# Altium PCB MSP430F5438A_Core_Board.PcbDoc
Units mil, origin at the board's own origin, x right, y up, seen from the top; angles counter-clockwise.
Board outline 2608.13 x 2230 mil, 2 copper layers (Top Layer, Bottom Layer); 34 components, 98 nets, 281 pads, 107 vias.
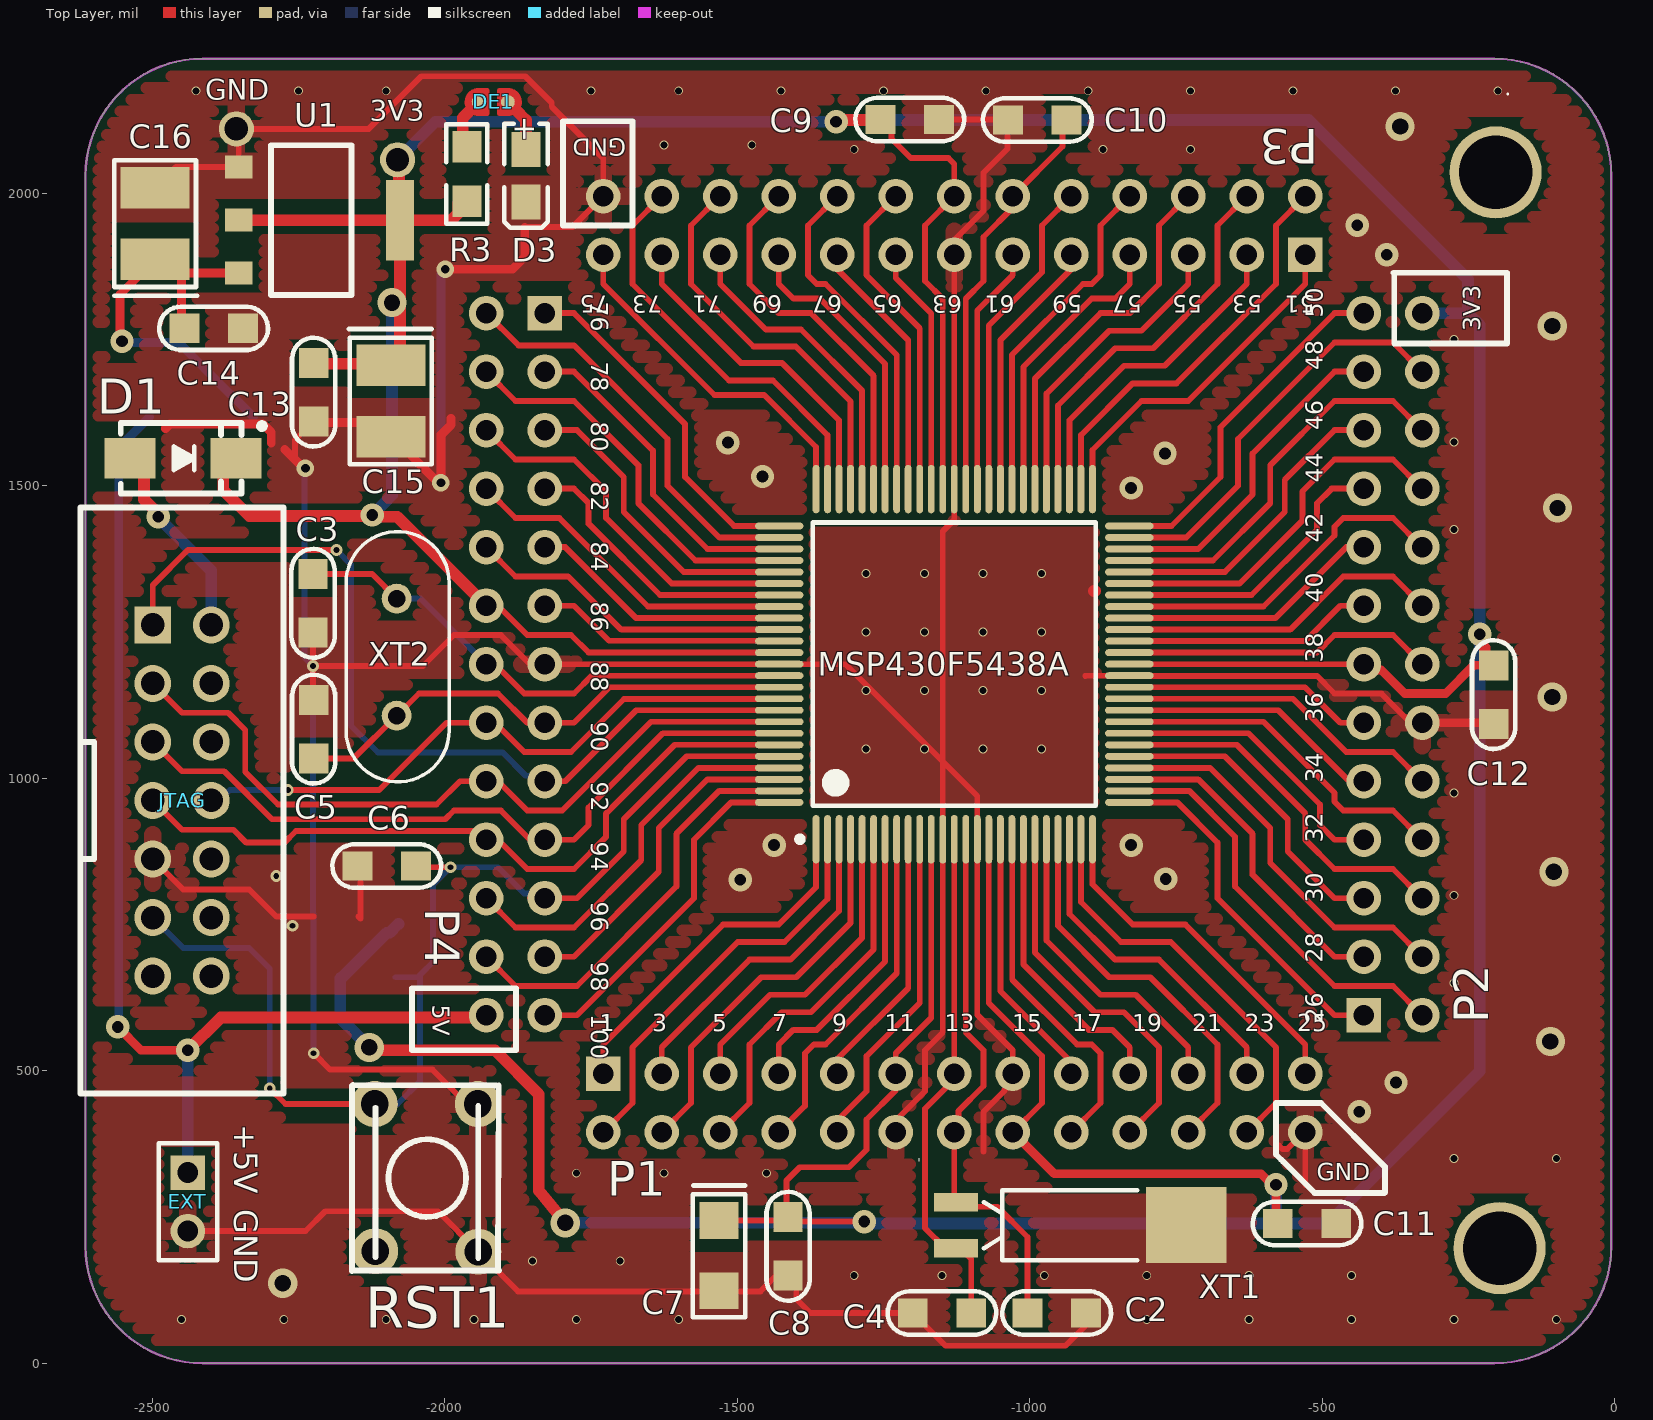
[diagram p0: Top Layer view]
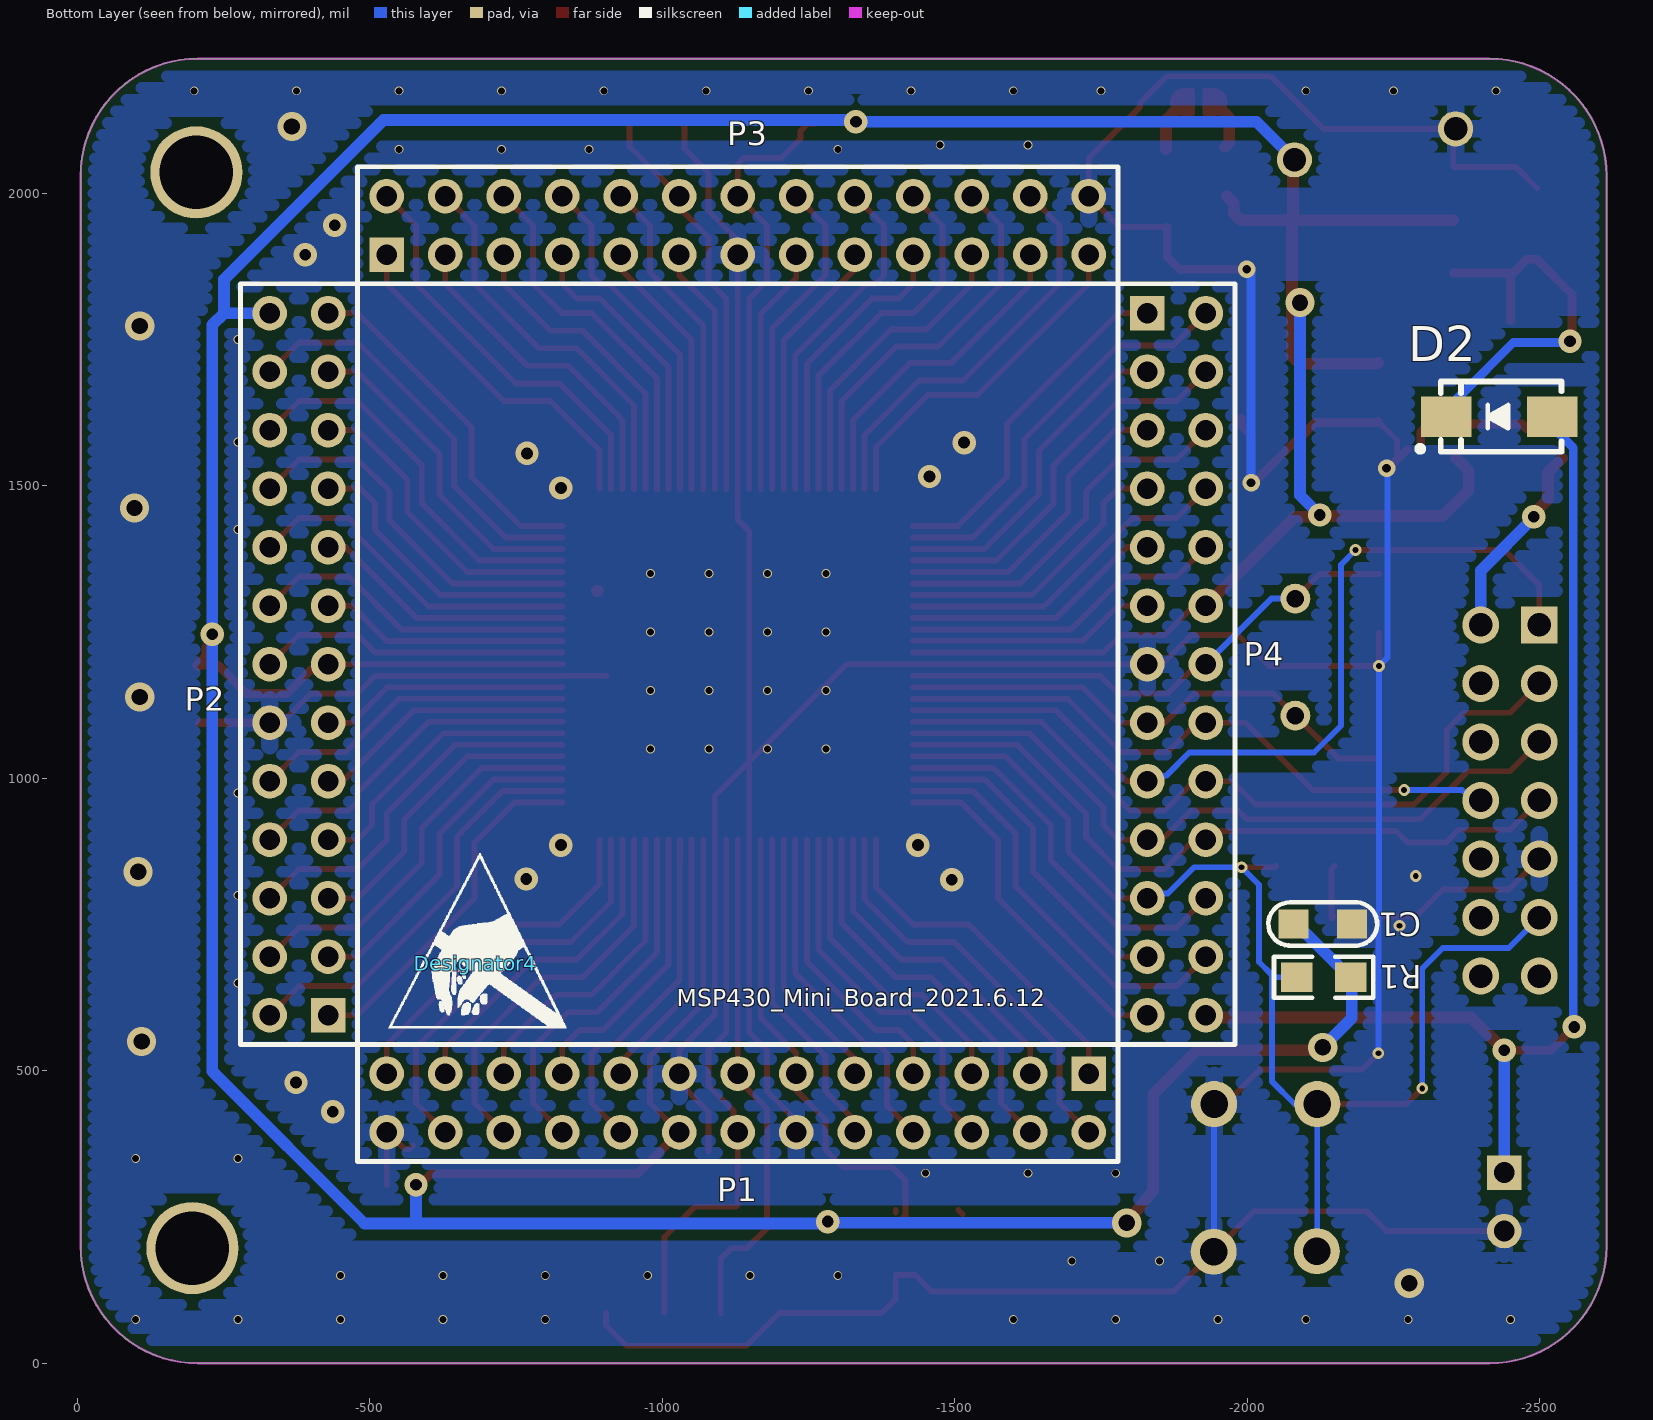
[diagram p1: Bottom Layer view, seen from below]

## Layer stack, top to bottom
Top Solder: solder mask 0.4, Solder Resist, Dk 3.5
Top Layer: signal copper 1.4
Dielectric1: dielectric 12.6, FR-4, Dk 4.8
Bottom Layer: signal copper 1.4
Bottom Solder: solder mask 0.4, Solder Resist, Dk 3.5

## Board outline
-2614,200 -2614,2030 cw(c-2414,2030) -2414,2230 -205.87,2230 cw(c-205.87,2030) -5.87,2030 -5.87,200 cw(c-205.87,200) -205.87,0 -2414,0 cw(c-2414,200)

## Design rules (kind name [scope] priority, off if disabled: settings)
Clearance poly [InPolygon] p1: gap=20 ignorepadtopadclearanceinfootprint=FALSE except(0: Arc-Hole Track-Hole SMDPad-Hole THPad-Hole Via-Hole Fill-Hole Poly-Region Poly-Text Poly-Hole Region-Hole Text-Hole; 10: Arc-Poly Track-Poly SMDPad-Poly THPad-Poly Via-Poly Fill-Poly Poly-Poly)
Clearance MSP430F5438 [InComponent('MSP430F5438')] p2: gap=6 ignorepadtopadclearanceinfootprint=FALSE except(0: Arc-Hole Track-Hole SMDPad-Hole THPad-Hole Via-Hole Fill-Hole Poly-Hole Region-Hole Text-Hole)
Clearance signal [All] p3: gap=8 ignorepadtopadclearanceinfootprint=FALSE except(0: Arc-Hole Track-Hole SMDPad-Hole THPad-Hole Via-Hole Fill-Hole Poly-Hole Region-Hole Text-Hole; 6: SMDPad-SMDPad)
DiffPairsRouting [All] p1: maxlimit=10 minlimit=10 mostfreqgap=10 substack1={DAF84A33-5D85-44D9-B187-5EEDEE5C1D0D} toplayer_{daf84a33-5d85-44d9-b187-5eedee5c1d0d}_minwidth=15 toplayer_{daf84a33-5d85-44d9-b187-5eedee5c1d0d}_maxwidth=15 toplayer_{daf84a33-5d85-44d9-b187-5eedee5c1d0d}_prefwidth=15 bottomlayer_{daf84a33-5d85-44d9-b187-5eedee5c1d0d}_minwidth=15 bottomlayer_{daf84a33-5d85-44d9-b187-5eedee5c1d0d}_maxwidth=15 bottomlayer_{daf84a33-5d85-44d9-b187-5eedee5c1d0d}_prefwidth=15 substack2={A4BFDC1A-52A9-4A62-862A-EA300D616A80} toplayer_{a4bfdc1a-52a9-4a62-862a-ea300d616a80}_minwidth=15 toplayer_{a4bfdc1a-52a9-4a62-862a-ea300d616a80}_maxwidth=15 toplayer_{a4bfdc1a-52a9-4a62-862a-ea300d616a80}_prefwidth=15 bottomlayer_{a4bfdc1a-52a9-4a62-862a-ea300d616a80}_minwidth=15 bottomlayer_{a4bfdc1a-52a9-4a62-862a-ea300d616a80}_maxwidth=15 bottomlayer_{a4bfdc1a-52a9-4a62-862a-ea300d616a80}_prefwidth=15 substack3={3F915A36-B763-4A6B-97BD-B3E40C8C71F4} toplayer_{3f915a36-b763-4a6b-97bd-b3e40c8c71f4}_minwidth=15 toplayer_{3f915a36-b763-4a6b-97bd-b3e40c8c71f4}_maxwidth=15 toplayer_{3f915a36-b763-4a6b-97bd-b3e40c8c71f4}_prefwidth=15 bottomlayer_{3f915a36-b763-4a6b-97bd-b3e40c8c71f4}_minwidth=15 bottomlayer_{3f915a36-b763-4a6b-97bd-b3e40c8c71f4}_maxwidth=15 bottomlayer_{3f915a36-b763-4a6b-97bd-b3e40c8c71f4}_prefwidth=15 substack4={48F7E08D-F82E-4384-AB96-C3FD184F4D58} toplayer_{48f7e08d-f82e-4384-ab96-c3fd184f4d58}_minwidth=15 toplayer_{48f7e08d-f82e-4384-ab96-c3fd184f4d58}_maxwidth=15 toplayer_{48f7e08d-f82e-4384-ab96-c3fd184f4d58}_prefwidth=15 bottomlayer_{48f7e08d-f82e-4384-ab96-c3fd184f4d58}_minwidth=15 bottomlayer_{48f7e08d-f82e-4384-ab96-c3fd184f4d58}_maxwidth=15 bottomlayer_{48f7e08d-f82e-4384-ab96-c3fd184f4d58}_prefwidth=15 substack5={598D3BEE-A53D-4EBE-981A-87FF3B1BF0A2} toplayer_{598d3bee-a53d-4ebe-981a-87ff3b1bf0a2}_minwidth=15 toplayer_{598d3bee-a53d-4ebe-981a-87ff3b1bf0a2}_maxwidth=15 toplayer_{598d3bee-a53d-4ebe-981a-87ff3b1bf0a2}_prefwidth=15 bottomlayer_{598d3bee-a53d-4ebe-981a-87ff3b1bf0a2}_minwidth=15 bottomlayer_{598d3bee-a53d-4ebe-981a-87ff3b1bf0a2}_maxwidth=15 bottomlayer_{598d3bee-a53d-4ebe-981a-87ff3b1bf0a2}_prefwidth=15 toplayer_minwidth=15 toplayer_maxwidth=15 toplayer_prefwidth=15 bottomlayer_minwidth=15 bottomlayer_maxwidth=15 bottomlayer_prefwidth=15 substack6={9BED3A91-6FF6-4AC0-9484-6C846679E73A} toplayer_{9bed3a91-6ff6-4ac0-9484-6c846679e73a}_minwidth=15 toplayer_{9bed3a91-6ff6-4ac0-9484-6c846679e73a}_maxwidth=15 toplayer_{9bed3a91-6ff6-4ac0-9484-6c846679e73a}_prefwidth=15 bottomlayer_{9bed3a91-6ff6-4ac0-9484-6c846679e73a}_minwidth=15 bottomlayer_{9bed3a91-6ff6-4ac0-9484-6c846679e73a}_maxwidth=15 bottomlayer_{9bed3a91-6ff6-4ac0-9484-6c846679e73a}_prefwidth=15 substack7={07ACAAC9-AFB2-42D8-B364-51B12A73FC90} toplayer_{07acaac9-afb2-42d8-b364-51b12a73fc90}_minwidth=15 toplayer_{07acaac9-afb2-42d8-b364-51b12a73fc90}_maxwidth=15 toplayer_{07acaac9-afb2-42d8-b364-51b12a73fc90}_prefwidth=15 bottomlayer_{07acaac9-afb2-42d8-b364-51b12a73fc90}_minwidth=15 bottomlayer_{07acaac9-afb2-42d8-b364-51b12a73fc90}_maxwidth=15 bottomlayer_{07acaac9-afb2-42d8-b364-51b12a73fc90}_prefwidth=15 maxuncoupledlength=500
HoleSize [All] p1: absolutevalues=TRUE maxlimit=1000 minlimit=1 maxpercent=80.000 minpercent=20.000
PolygonConnect [All] p1: thpad.connectstyle=Relief thpad.reliefconductorwidth=30 thpad.reliefentries=4 thpad.polygonreliefangle="90 Angle" thpad.airgapwidth=10 smdpad.connectstyle=Direct smdpad.reliefconductorwidth=10 smdpad.reliefentries=4 smdpad.polygonreliefangle="90 Angle" smdpad.airgapwidth=10 via.connectstyle=Direct via.reliefconductorwidth=10 via.reliefentries=4 via.polygonreliefangle="90 Angle" via.airgapwidth=10
RoutingVias [All] p1: holewidth=15 width=30 viastyle="Through Hole" minholewidth=10 minwidth=20 maxholewidth=28 maxwidth=50
SilkToSolderMaskClearance SilkscreenOverComponentPads [IsPad] p1: minsilkscreentomaskgap=0 clearancetoexposedcopper=TRUE
SolderMaskExpansion [All] p1: expansion=4 istentingtop=FALSE
Width [All] p1: maxlimit=30 minlimit=6 preferedwidth=10 substack1={DAF84A33-5D85-44D9-B187-5EEDEE5C1D0D} substack2={A4BFDC1A-52A9-4A62-862A-EA300D616A80} substack3={3F915A36-B763-4A6B-97BD-B3E40C8C71F4} substack4={48F7E08D-F82E-4384-AB96-C3FD184F4D58} substack5={598D3BEE-A53D-4EBE-981A-87FF3B1BF0A2} substack6={9BED3A91-6FF6-4AC0-9484-6C846679E73A} substack7={07ACAAC9-AFB2-42D8-B364-51B12A73FC90}
27 further rules are at their usual default settings.

## Components (designator, comment, footprint, x,y, rotation, side; value= is the part's Value field where it differs from the comment)
C1 "Cap" C0805 -2129,751 r180 bottom value=0.1uF
C2 "Cap" c0805 -954,86 r180 top value=22pF
C3 "Cap" c0805 -2225,1299 r90 top value=22pF
C4 "Cap" C0805 -1150,86 r0 top value=22pF
C5 "Cap" c0805 -2224,1084 r270 top value=22pF
C6 "Cap" c0805 -2099,850 r180 top value=10nF
C7 "Cap Pol1" 3216 -1531,184 r270 top value=4.7uF
C8 "Cap" C0805 -1413,200 r270 top value=0.1uF
C9 "Cap" C0805 -1205,2126 r0 top value=0.1uF
C10 "Cap" c0805 -987,2125 r180 top value=0.47uF
C11 "Cap" C0805 -526.03,239 r180 top value=0.1uF
C12 "Cap" C0805 -207,1143 r270 top value=0.1uF
C13 "Cap" C0805 -2224,1660 r270 top value=0.1uF
C14 "Cap" C0805 -2395,1769 r0 top value=0.1uF
C15 "Cap Pol1" 3528 -2092,1645 r270 top value=10uF/16V
C16 "Cap Pol1" 3528 -2495,1948 r90 top value=10uF/16V
D1 "SS24" SMA -2447.41,1547 r0 top
D2 "SS24" SMA -2430.55,1618 r0 bottom
D3 "RED" Diode0805 -1861,2030 r270 top
DE1 "DEBUG PAD" DEBUG_B -1917,2156 r0 top
Designator4 "Comment" ICO1 -680,684 r180 bottom
EXT "Header 2H" HDR1X2 -2439,326 r270 top
JTAG "Header 7X2" DC-2.54-L-Z-14P -2449,962 r270 top locked
MSP430F5438A "MSP430F5438IPZ" PZ100_M -1129,1195 r90 top
P1 "Header 13X2H" HDR2X13 -1729,495 r0 bottom
P2 "Header 13X2H" HDR2X13 -429,595 r90 bottom
P3 "Header 13X2H" HDR2X13 -529,1895 r180 bottom
P4 "Header 13X2H" HDR2X13 -1829,1795 r270 bottom
R1 "Res2" 0805 -2130.57,660 r180 bottom value=47K
R3 "Res2" 0805 -1962,2033 r270 top value=330R
RST1 "SW-PB" BUTTON -2031,317 r270 top
U1 "1117M3" SOT-223 -2352,1954 r270 top
XT1 "32K" OSC-3x8-WS -1125.96,236 r270 top
XT2 "25MHz" JZ-2 -2082,1207 r90 top

## Footprints (in the part's own frame and the unit in brackets; to place one, negate y for a bottom-side part, rotate by r counter-clockwise, add the part's x,y. Pads: shape width x height; smd on the part's side, far side on the other; paste and mask are expansions set on the pad)
0805 [mil] "Chip Resistor, Body 2.0x1.2mm, IPC Medium Density"
  rect 54x50 smd: 1(-46.24,0) 2(46.43,0)
  silkscreen extent -85,-35 85,35, body extent -42,-28 42,28, height 28
3216 [mm]
  rect 1.6x1.7 smd: A(-1.524,0) K(1.524,0)
  silkscreen extent -3.05,-1.14 2.67,1.14
3528 [mm]
  rect 1.8x3 smd: A(-1.55,0) K(1.55,0)
  silkscreen extent -3.12,-1.83 2.75,1.78
BUTTON [mm]
  round 2 hole 1.2: 1(-3.205,2.23) 1(3.205,2.25) 2(-3.205,-2.25) 2(3.185,-2.23)
  silkscreen extent -4.03,-3.23 4.05,3.15
C0805 [mm] "Chip Capacitor, Body 2.0x1.3mm, IPC High Density"
  rect 1.3x1.27 smd: 1(-1.27,0) 2(1.27,0)
  silkscreen extent -2.36,-0.94 2.36,0.94, body extent -1.07,-0.7 1.07,0.7, height 0.7
c0805 [mm] "Chip Capacitor, Body 2.0x1.3mm, IPC High Density"
  rect 1.3x1.27 smd: 1(-1.27,0) 2(1.27,0)
  silkscreen extent -2.36,-0.94 2.36,0.94, body extent -1.07,-0.7 1.07,0.7, height 0.7
DC-2.54-L-Z-14P [mm] "立式直插简牛插座，间距2.54"
  rect 1.6x1.6 hole 1.02: 1(-7.62,-1.27)
  round 1.6 hole 1.02: 2(-7.62,1.27) 3(-5.08,-1.27) 4(-5.08,1.27) 5(-2.54,-1.27) 6(-2.54,1.27) 7(0,-1.27) 8(0,1.27) 9(2.54,-1.27) 10(2.54,1.27) 11(5.08,-1.27) 12(5.08,1.27) 13(7.62,-1.27) 14(7.62,1.27)
  silkscreen extent -12.72,-4.4 12.72,4.4, body extent -12.7,-4.35 12.7,4.5, height 2.54
DEBUG_B [mm] "调试断点焊盘"
  round 0.6 smd paste-0.6: 1(-0.635,0) 2(0.635,0)
  Top Layer region: 0.254,-0.508 0.762,-0.508 0.908,-0.479 1.031,-0.396 1.114,-0.273 1.143,-0.127 1.143,-0.127 1.143,0 1.104,0.194 0.994,0.359 0.829,0.469 0.635,0.508 0.635,0.508 0.254,0.508
  Top Layer region: -0.254,0.508 -0.762,0.508 -0.908,0.479 -1.031,0.396 -1.114,0.273 -1.143,0.127 -1.143,0.127 -1.143,0 -1.104,-0.194 -0.994,-0.359 -0.829,-0.469 -0.635,-0.508 -0.635,-0.508 -0.254,-0.508
  Top Layer lines w0.203: -0.994,-0.359 ccw(c-0.635,0) -0.635,-0.508 -0.254,-0.508 -0.254,0 -0.254,0.508 -0.635,0.508 ccw(c-0.635,0) -0.994,-0.359 ; 0.254,-0.508 0.254,0 0.254,0.508 0.635,0.508 cw(c0.635,0) 0.994,-0.359 cw(c0.635,0) 0.635,-0.508 0.254,-0.508
Diode0805 [mil]
  rect 60x50 smd: 1(-45,0) 2(45,0)
  silkscreen extent -89,-37 89,37
HDR1X2 [mm] "Connector; Header; 2 Position"
  rect 1.5x1.5 hole 0.9: 1(0,0)
  round 1.5 hole 0.9: 2(2.54,0)
  silkscreen extent -1.27,-1.27 3.81,1.27
HDR2X13 [mm] "Connector; Header; 13x2 Position"
  rect 1.5x1.5 hole 0.9: 1(0,0)
  round 1.5 hole 0.9: 2(0,2.54) 3(2.54,0) 4(2.54,2.54) 5(5.08,0) 6(5.08,2.54) 7(7.62,0) 8(7.62,2.54) 9(10.16,0) 10(10.16,2.54) 11(12.7,0) 12(12.7,2.54) 13(15.24,0) 14(15.24,2.54) 15(17.78,0) 16(17.78,2.54) 17(20.32,0) 18(20.32,2.54) 19(22.86,0) 20(22.86,2.54) 21(25.4,0) 22(25.4,2.54) 23(27.94,0) 24(27.94,2.54) 25(30.48,0) 26(30.48,2.54)
  silkscreen extent -1.27,-1.27 31.75,3.81
ICO1 [mil]
  silkscreen extent -148,-111 156,187
JZ-2 [mm]
  round 1.3 hole 0.762: 1(-2.54,0) 2(2.54,0)
  silkscreen extent -5.41,-2.29 5.45,2.2
OSC-3x8-WS [mm] "脚距：2mm  淘宝ID:小糖豆的小窝窝"
  rect 3.3x3.5 smd: 0(0,10)
  rect 0.8x1.9 smd: 1(1,0) 2(-1,0)
  silkscreen extent -1.52,1.2 1.52,7.87, body extent -1.5,-0.5 1.5,10, height 3.03
PZ100_M [mm] "100-Pin Thin Quad Flat Pack 0.5 mm Pitch, IPC Low Density"
  oval 2.1x0.3 smd: 1(-7.6,6) 2(-7.6,5.5) 3(-7.6,5) 4(-7.6,4.5) 5(-7.6,4) 6(-7.6,3.5) 7(-7.6,3) 8(-7.6,2.5) 9(-7.6,2) 10(-7.6,1.5) 11(-7.6,1) 12(-7.6,0.5) 13(-7.6,0) 14(-7.6,-0.5) 15(-7.6,-1) 16(-7.6,-1.5) 17(-7.6,-2) 18(-7.6,-2.5) 19(-7.6,-3) 20(-7.6,-3.5) 21(-7.6,-4) 22(-7.6,-4.5) 23(-7.6,-5) 24(-7.6,-5.5) 25(-7.6,-6) 51(7.6,-6) 52(7.6,-5.5) 53(7.6,-5) 54(7.6,-4.5) 55(7.6,-4) 56(7.6,-3.5) 57(7.6,-3) 58(7.6,-2.5) 59(7.6,-2) 60(7.6,-1.5) 61(7.6,-1) 62(7.6,-0.5) 63(7.6,0) 64(7.6,0.5) 65(7.6,1) 66(7.6,1.5) 67(7.6,2) 68(7.6,2.5) 69(7.6,3) 70(7.6,3.5) 71(7.6,4) 72(7.6,4.5) 73(7.6,5) 74(7.6,5.5) 75(7.6,6)
  oval 0.3x2.1 smd: 26(-6,-7.6) 27(-5.5,-7.6) 28(-5,-7.6) 29(-4.5,-7.6) 30(-4,-7.6) 31(-3.5,-7.6) 32(-3,-7.6) 33(-2.5,-7.6) 34(-2,-7.6) 35(-1.5,-7.6) 36(-1,-7.6) 37(-0.5,-7.6) 38(0,-7.6) 39(0.5,-7.6) 40(1,-7.6) 41(1.5,-7.6) 42(2,-7.6) 43(2.5,-7.6) 44(3,-7.6) 45(3.5,-7.6) 46(4,-7.6) 47(4.5,-7.6) 48(5,-7.6) 49(5.5,-7.6) 50(6,-7.6) 76(6,7.6) 77(5.5,7.6) 78(5,7.6) 79(4.5,7.6) 80(4,7.6) 81(3.5,7.6) 82(3,7.6) 83(2.5,7.6) 84(2,7.6) 85(1.5,7.6) 86(1,7.6) 87(0.5,7.6) 88(0,7.6) 89(-0.5,7.6) 90(-1,7.6) 91(-1.5,7.6) 92(-2,7.6) 93(-2.5,7.6) 94(-3,7.6) 95(-3.5,7.6) 96(-4,7.6) 97(-4.5,7.6) 98(-5,7.6) 99(-5.5,7.6) 100(-6,7.6)
  silkscreen extent -7.72,-6.15 6.15,6.82, body extent -7,-7 7,7, height 1.6
SMA [mm] "4.5x2.6*2.2mm（长宽高，不包括引脚）"
  rect 2.2x1.75 smd: 1(-2.3,0) 2(2.3,0)
  silkscreen extent -2.7,-1.52 3.56,1.52, body extent -2.53,-1.3 2.58,1.3, height 2.15
SOT-223 [mm]
  rect 3.5x1.2 smd: 0(0,7)
  rect 1x1.2 smd: 1(-2.3,0) 2(0,0) 3(2.3,0)
  silkscreen extent -3.25,1.4 3.25,4.9

## Part data
C1 C2 C3 C4 C5 C6 C8 C9 C10 C11 C12 C13 C14: "Capacitor", LatestRevisionDate=17-Jul-2002, LatestRevisionNote="Re-released for DXP Platform.", PackageReference=RAD-0.3, Published=8-Jun-2000, Publisher="Altium Limited"
  C1 C2 C3 C4 C5 C6 C8 C9 C10 C11 C12: PackageDescription="Radial Cap, Thru-Hole; 2 Leads; 0.3 in Pin Spacing"
C7 C15 C16: "Polarized Capacitor (Radial)", LatestRevisionDate=17-Jul-2002, LatestRevisionNote="Re-released for DXP Platform.", PackageDescription="Polarized Capacitor (Radial); 2 Leads", PackageReference=RB7.6-15, Published=8-Jun-2000, Publisher="Altium Limited"
D1 D2: "肖特基二极管", BOM名称=肖特基二极管, 下单链接=https://item.taobao.com/item.htm?ft=t&id=613637044352, 淘宝ID=小糖豆的小窝窝
D3: library part LED0, "Typical INFRARED GaAs LED", LatestRevisionDate=08-Jul-2005, LatestRevisionNote="Mech Layer 1 removed.", PackageDescription="LED; 2 Leads", PackageReference=LED-0, Published=8-Jun-2000, Publisher="Altium Limited"
DE1: library part DEBUG, "调试断点焊盘", BOM名称=调试断点焊盘, 下单链接=https://item.taobao.com/item.htm?ft=t&id=613637044352, 淘宝ID=小糖豆的小窝窝
EXT: "Header, 2-Pin, Right Angle", LatestRevisionDate=17-Jul-2002, LatestRevisionNote="Re-released for DXP Platform.", Publisher="Altium Limited"
JTAG: "Header, 7-Pin, Dual row", LatestRevisionDate=17-Jul-2002, LatestRevisionNote="Re-released for DXP Platform.", Publisher="Altium Limited"
P1 P2 P3 P4: "Header, 13-Pin, Dual row, Right Angle", LatestRevisionDate=17-Jul-2002, LatestRevisionNote="Re-released for DXP Platform.", Publisher="Altium Limited"
R1 R3: "Resistor", LatestRevisionDate=17-Jul-2002, LatestRevisionNote="Re-released for DXP Platform.", PackageDescription="Axial Device, Thru-Hole; 2 Leads; 0.4 in Pin Spacing", PackageReference=AXIAL-0.4, Published=8-Jun-2000, Publisher="Altium Limited"
RST1: "Switch", LatestRevisionDate=17-Jul-2002, LatestRevisionNote="Re-released for DXP Platform.", PackageDescription="Switch; 2 Leads", PackageReference=SPST-2, Published=24-Mar-1999, Publisher="Altium Limited"
XT1 XT2: library part XTAL, "Crystal Oscillator", LatestRevisionDate=17-Jul-2002, LatestRevisionNote="Re-released for DXP Platform.", PackageDescription="Crystal, Thru-Hole; 2 Leads; Body 3.1 x 8.2 mm (Dia.xH)", PackageReference=R38, Published=8-Jun-2000, Publisher="Altium Limited"

## Free pads (board coordinates)
  round 157.48 hole 125.98: 3(-203.6,2035.62) 4(-196.85,196.85)
  round 60 hole 40: Q(-2356,2110) Q(-2080.6,2057.1)

## Via types
v1: diameter 15, hole 12, Top Layer to Bottom Layer, tented both sides, 65 vias
v2: diameter 40, hole 20, Top Layer to Bottom Layer, tented both sides, 21 vias
v3: diameter 50, hole 28, Top Layer to Bottom Layer, tented both sides, 10 vias
v4: diameter 20, hole 10, Top Layer to Bottom Layer, tented both sides, 8 vias
v5: diameter 30, hole 15, Top Layer to Bottom Layer, tented both sides, 3 vias

## Nets (pads, with @x,y where several pads share a name; then routed paths per layer and width w, separated by ;. In a path a pad name is that pad's centre, name@x,y a point inside that pad or via, vN(x,y) a via of type N, cw(c..) or ccw(c..) an arc to the next point about the centre after c; other vN are vias at no path point)
AVCC: C1.1 C7.A C8.1 C9.1 C11.2 C12.1 C13.1 C15.A D1.2 MSP430F5438A.11 MSP430F5438A.16 MSP430F5438A.38 MSP430F5438A.64 MSP430F5438A.87 P1.11 P1.16 P2.13 P2.26 P3.14 P4.12 pad.Q@-2080.6,2057.1 R1.2 R3.2 U1.0 U1.2 | length 12135.3
  Top Layer w10: P4.12 -1909,1295 -1859,1245 -1784,1245 -1754,1215 MSP430F5438A.87@-1428.21,1215 ; C7.A -1419,244 C8.1 -1405.24,242.24 v2(-1283,242.24) ; C7.A@-1513,255 C7.A@-1506,262 ; C8.1@-1416,250 -1416,312 -1393,335 -1309,335 -1279,365 -1279,416.72 -1229,466.72 P1.11 -1229,530 -1168.37,590.63 MSP430F5438A.11 ; C8.1@-1399,258 C8.1@-1399,262 ; C9.1@-1265,2122 -1262,2119 -1249.1,2119 -1236.1,2106 -1236.1,2093.1 -1203,2060 -1139,2060 -1129,2050 P3.14 -1179,1945 -1179,1850 -1148.68,1819.68 MSP430F5438A.64 ; MSP430F5438A.16 -1069.94,615.94 -979,525 -979,445 P1.16 ; MSP430F5438A.38 P2.13 P2.13@-419,1185 ; C11.2@-579.14,242.11 C11.2
  Top Layer w15: P1.16 -958,324 -604.76,324 -584.14,303.38 v2@-584.14,300.14 ; C11.2@-579.14,242.11 v2@-579.14,295.14 ; P2.13@-419,1185 -399,1185 -359,1145 -289,1145 -241,1193 C12.1
  Top Layer w20: D1.2 -2378.57,1525.29 -2378.57,1492.55 -2334.3,1448.28 -2125.72,1448.28 v2(-2124,1450) -2121,1447 -2081,1447 P4.12 ; U1.2 U1.0 ; C13.1 -2222.28,1708.28 -2094.26,1708.28 C15.A -2076.41,1721.61 -2076.41,1813 U1.0 ; v3@-2134,545 v3(-2129,540) -2124,535 -1914,535 -1839,460 -1839,295 v3(-1794,240) ; pad.Q@-2080.6,2057.1 -2078.2,2053.2 -2078.2,1955.8 U1.0 ; R3.2@-1965,1995 -1977,1983 -1977,1965.72 -1988.72,1954 U1.0 ; v2(-1331,2122) -1328,2125 C9.1@-1256,2125 ; -222,1223.2 -222,1208 C12.1
  Bottom Layer w10: P1.16@-1029,370 P1.16
  Bottom Layer w20: R1.2 -2178.76,658.24 -2178.76,589.76 v3(-2129,540) ; R1.2@-2175,660 -2140.84,694.16 -2099,736 -2094,736 C1.1 ; v2(-2124,1450) -2090,1484 v3(-2090,1813) ; pad.Q@-2080.6,2057.1 -2015.7,2122 v2(-1331,2122) ; v3(-1794,240) v2@-1283,240 ; v2@-1331,2125 -523,2125 -251,1853 -251,1795 ; v2(-1283,242.24) -1279.76,239 -576.03,239 ; v2(-579,305) -579,241.97 -576.03,239 ; P2.26 -251,1795 ; -576.03,239 -491,239 -231,499 v2(-231,1246) -231,1775 -251,1795
AVSS: C1.2 C2.1 C3.1 C4.1 C5.1 C6.2 C7.K C8.2 C9.2 C10.2 C11.1 C12.2 C13.2 C14.2 C15.K C16.K D3.2 EXT.2 JTAG.9 MSP430F5438A.12 MSP430F5438A.15 MSP430F5438A.37 MSP430F5438A.63 MSP430F5438A.88 P1.12 P1.15 P1.26 P2.12 P3.13 P3.26 P4.13 pad.Q@-2356,2110 RST1.1 U1.1 XT1.0 | length 11040.2
  Top Layer w10: JTAG.9 -2447,810 -2334,810 -2287.5,763.5 -2224,763.5 ; C16.K -2459.47,2044.55 U1.1 -2352,2092 -2334,2110 -2129.84,2110 -2039.84,2200 -1862.29,2200 -1817,2154.71 -1817,2148 -1729,2060 P3.26 -1782,1942 -1863,1942 ; EXT.2 -2238,226 -2204,260 -2011.6,260 -1942.42,190.82 -1874.6,123 -1460.24,123 -1432.24,151 -1399,151 -1399,110 -1375,86 C4.1 -1144,30 -939,30 -904,65 C2.1 ; -2255.86,1544.42 -2255.86,1578.28 -2244.73,1589.41 -2244,1589.41 -2224,1609.41 C13.2 ; C3.1 v4(-2225,1192) ; v4(-2224,530) -2196,502 -2021,502 -1962.18,443.18 RST1.1@-1943.2,443.18 ; C5.1 -2225,1135 v4(-2225,1192) ; C6.2 -2144,845 -2144,760 -2147.5,763.5 ; C15.K@-2118.02,1610 C15.K ; P1.12 -1229,415 -1179,465 -1179,535 -1148.68,565.32 MSP430F5438A.12 -1148.68,1028.68 ; C9.2 C10.2@-1038,2126 ; -1079,362 -1079,430 -1042.99,466.01 -1042.99,467.74 -1029,481.73 P1.15 -1029,535 -1089.63,595.63 MSP430F5438A.15 -1089.63,969.63 -1148.68,1028.68 ; C10.2 C10.2@-1038,2126 ; -905,1175 -904.68,1175.32 MSP430F5438A.37 -829.47,1175 -509,1175 -479,1145 -399,1145 -349,1095 P2.12 ; -574,372 -568.14,366.14 -559.86,366.14 -531,395 P1.26 -529,305 ; C12.2@-209,1095 C12.2 ; v4(-2225,1192) -2037,1192 -1984,1245 -1904,1245 -1854,1195 P4.13 MSP430F5438A.88 -1315,1195 -1148.68,1028.68 ; -1148.68,1028.68 -1148.68,1422.16 -1129,1441.84 MSP430F5438A.63 P3.13 -1129,1920 -1079,1970 -1079,2035 -1038,2076 C10.2@-1038,2126
  Top Layer w15: -2477.35,1597.69 -2469.31,1605.73 -2310.93,1605.73 -2296.35,1591.15 -2296.35,1573.28 ; -2273.44,1562 -2255.86,1544.42 ; -2255.72,1544.28 -2241.44,1530 v5(-2238,1530) ; C13.2 -2222.28,1608.28 -2116.3,1608.28 C15.K -2090.98,1585 -2010.98,1505 v5(-2006.49,1505) -2006.49,1586.58 -1989,1604.07 -1989,1615 ; v5(-1999,1870) -1884,1870 -1863,1891 -1863,1942 ; P2.12 C12.2@-209,1095
  Top Layer w20: -890.19,1320 -888.11,1320
  Bottom Layer w10: v5(-2238,1530) -2239.86,1528.14 -2239.86,1206.86 v4(-2225,1192) -2225,774 -2224,765 v4(-2224,530) ; RST1.1@-1943.2,443.18 -1943.2,191.61 RST1.1@-1942.42,190.82
  Bottom Layer w15: v5(-2006.49,1505) -2006.49,1862.51 v5(-1999,1870)
  other v1: -2450,75 -2275,75 -2100,75 -1950,75 -1775,75 -1600,75 -800,75 -625,75 -450,75 -275,75 -100,75 -1300,150 -1150,150 -975,150 -800,150 -625,150 -450,150 -1850,175 -1700,175 -1775,325 -1625,325 -1450,325 -275,350 -100,350 -275,650 -275,800 -275,975 -1280,1050 -1180,1050 -1080,1050 -980,1050 -1280,1150 -1180,1150 -1080,1150 -980,1150 -1280,1250 -1180,1250 -1080,1250 -980,1250 -1280,1350 -1180,1350 -1080,1350 -980,1350 -275,1425 -275,1575 -275,1750 -1300,2075 -875,2075 -725,2075 -550,2075 -1625,2082.6 -1475,2082.6 -2425,2175 -2250,2175 -2100,2175 -1750,2175 -1600,2175 -1425,2175 -1250,2175 -1075,2175 -900,2175 -725,2175 -550,2175 -375,2175 -200,2175
  other v2: -437,430 -374,480 -1495.02,826.65 -767.6,827.82 -1437.01,885.83 -826.77,885.83 -826.77,1496.06 -1456.69,1515.75 -768.76,1555.24 -1515.87,1573.76 -390,1895 -440,1945
  other v3: -2277,137 -110,550 -104,840 -107,1139 -98,1462 -107,1773 -367,2114
  other v4: -2260,748 -2288,833
NetC14_1: C14.1 C16.A D2.2 U1.3 | length 680.8
  Top Layer w15: v2(-2551.5,1747) -2555,1750.5 -2555,1826.98 C16.A -2477.93,1886.98 C16.A@-2454.41,1863.45 ; C14.1@-2450.59,1782 -2450,1782 -2450,1859.04 C16.A@-2454.41,1863.45 ; U1.3 C16.A@-2454.41,1863.45
  Bottom Layer w15: v2(-2551.5,1747) -2548,1747 -2546,1745 -2455,1745 -2365.78,1655.78 -2364.78,1655.78 D2.2@-2327,1618
NetD1_1: D1.1 JTAG.2 | length 343.6
  Top Layer w20: D1.1 -2514,1523.04 -2514,1476.56 -2489.85,1452.41 v2(-2489.85,1447)
  Bottom Layer w20: v2@-2491.39,1447.39 -2399,1355 JTAG.2
NetD3_1: D3.1 DE1.2 | length 93.8
  Top Layer w20: DE1.2 -1877.86,2141.86 -1861,2125 D3.1
NetDE1_1: DE1.1 R3.1 | length 90.8
  Top Layer w20: R3.1 -1969,2086.24 -1969,2129 -1956.14,2141.86 DE1.1
NetJP10_1: 
P1_0: MSP430F5438A.17 P1.17 | length 451
  Top Layer w10: MSP430F5438A.17 -1050.26,636.26 -929,515 P1.17
P1_1: MSP430F5438A.18 P1.18 | length 598.9
  Top Layer w10: MSP430F5438A.18 -1030.23,895.44 -1030.23,858.73 -1029.8,858.29 -1029.8,655.8 -919,545 -894,545 -879,530 -879,445 P1.18
P1_2: MSP430F5438A.19 P1.19 | length 499.6
  Top Layer w10: MSP430F5438A.19 -1010.89,681.89 -899,570 -859,570 -829,540 P1.19
P1_3: MSP430F5438A.20 P1.20 | length 638.7
  Top Layer w10: MSP430F5438A.20 -991.2,702.2 -889,600 -839,600 -779,540 -779,445 P1.20
P1_4: MSP430F5438A.21 P1.21 | length 536.4
  Top Layer w10: MSP430F5438A.21 -971.52,722.52 -879,630 -819,630 -729,540 P1.21
P1_5: MSP430F5438A.22 P1.22 | length 675.5
  Top Layer w10: MSP430F5438A.22 -951.83,747.83 -864,660 -794,660 -679,545 -679,445 P1.22
P1_6: MSP430F5438A.23 P1.23 | length 570.3
  Top Layer w10: MSP430F5438A.23 -932.15,768.15 -854,690 -779,690 -629,540 P1.23
P1_7: MSP430F5438A.24 P1.24 | length 709.4
  Top Layer w10: MSP430F5438A.24 -912.46,788.46 -844,720 -759,720 -579,540 -579,445 P1.24
P2_0: MSP430F5438A.25 P1.25 | length 604.2
  Top Layer w10: MSP430F5438A.25 -892.78,818.78 -824,750 -734,750 -529,545 P1.25
P2_1: MSP430F5438A.26 P2.1 | length 607.1
  Top Layer w10: MSP430F5438A.26 -747.78,958.78 -679,890 -679,795 -479,595 P2.1
P2_2: MSP430F5438A.27 P2.2 | length 709.4
  Top Layer w10: MSP430F5438A.27 -727.46,978.46 -649,900 -649,815 -479,645 -379,645 P2.2
P2_3: MSP430F5438A.28 P2.3 | length 567.4
  Top Layer w10: MSP430F5438A.28 -712.15,998.15 -619,905 -619,835 -479,695 P2.3
P2_4: MSP430F5438A.29 P2.4 | length 669.7
  Top Layer w10: MSP430F5438A.29 -691.83,1017.83 -589,915 -589,855 -479,745 -379,745 P2.4
P2_5: MSP430F5438A.30 P2.5 | length 533.5
  Top Layer w10: MSP430F5438A.30 -666.52,1037.52 -559,930 -559,875 -479,795 P2.5
P2_6: MSP430F5438A.31 P2.6 | length 635.8
  Top Layer w10: MSP430F5438A.31 -646.2,1057.2 -529,940 -529,895 -479,845 -379,845 P2.6
P2_7: MSP430F5438A.32 P2.7 | length 496.6
  Top Layer w10: MSP430F5438A.32 -625.89,1076.89 -504,955 -504,920 -479,895 P2.7
P3_0: MSP430F5438A.33 P2.8 | length 593.1
  Top Layer w10: MSP430F5438A.33 -600.57,1096.57 -479,975 -479,960 -464,945 -379,945 P2.8
P3_1: MSP430F5438A.34 P2.9 | length 451
  Top Layer w10: MSP430F5438A.34 -575.26,1116.26 -454,995 P2.9
P3_2: MSP430F5438A.35 P2.10 | length 559.2
  Top Layer w10: MSP430F5438A.35 -549.94,1135.94 -459,1045 -379,1045 P2.10
P3_3: MSP430F5438A.36 P2.11 | length 425.9
  Top Layer w10: MSP430F5438A.36 -529.63,1155.63 -469,1095 P2.11
P3_4: MSP430F5438A.39 P2.14 | length 534.1
  Top Layer w10: MSP430F5438A.39 -509.32,1214.68 -479,1245 -379,1245 P2.14
P3_5: MSP430F5438A.40 P2.15 | length 425.9
  Top Layer w10: MSP430F5438A.40 -529.63,1234.37 -469,1295 P2.15
P3_6: MSP430F5438A.41 P2.16 | length 559.2
  Top Layer w10: MSP430F5438A.41 -554.94,1254.06 -464,1345 -379,1345 P2.16
P3_7: MSP430F5438A.42 P2.17 | length 451
  Top Layer w10: MSP430F5438A.42 -580.26,1273.74 -459,1395 P2.17
P4_0: MSP430F5438A.43 P2.18 | length 593.1
  Top Layer w10: MSP430F5438A.43 -600.57,1293.43 -479,1415 -479,1430 -464,1445 -379,1445 P2.18
P4_1: MSP430F5438A.44 P2.19 | length 502.5
  Top Layer w10: MSP430F5438A.44 -620.89,1313.11 -509,1425 -509,1470 -484,1495 P2.19
P4_2: MSP430F5438A.45 P2.20 | length 638.7
  Top Layer w10: MSP430F5438A.45 -641.2,1332.8 -534,1440 -534,1490 -479,1545 -379,1545 P2.20
P4_3: MSP430F5438A.46 P2.21 | length 533.5
  Top Layer w10: MSP430F5438A.46 -666.52,1352.48 -564,1455 -564,1510 -479,1595 P2.21
P4_4: MSP430F5438A.47 P2.22 | length 672.6
  Top Layer w10: MSP430F5438A.47 -686.83,1372.17 -589,1470 -589,1535 -479,1645 -379,1645 P2.22
P4_5: MSP430F5438A.48 P2.23 | length 567.4
  Top Layer w10: MSP430F5438A.48 -712.15,1391.85 -619,1485 -619,1555 -479,1695 P2.23
P4_6: MSP430F5438A.49 P2.24 | length 706.5
  Top Layer w10: MSP430F5438A.49 -732.46,1411.54 -644,1500 -644,1580 -479,1745 -379,1745 P2.24
P4_7: MSP430F5438A.50 P2.25 | length 601.3
  Top Layer w10: MSP430F5438A.50 -757.78,1431.22 -674,1515 -674,1600 -479,1795 P2.25
P5_0: MSP430F5438A.9 P1.9 | length 451
  Top Layer w10: P1.9 -1329,520 -1207.74,641.26 MSP430F5438A.9
P5_1: MSP430F5438A.10 P1.10 | length 559.2
  Top Layer w10: P1.10 -1329,415 -1279,465 -1279,525 -1188.06,615.94 MSP430F5438A.10
P5_2/XT2IN: C3.2 MSP430F5438A.89 P4.14 XT2.2 | length 893.8
  Top Layer w10: C3.2 -2124,1349 XT2.2 ; P4.14 -1914,1195 -1864,1145 -1779,1145 -1748.68,1175.32 MSP430F5438A.89
  Bottom Layer w10: XT2.2 -2041,1307 P4.14
P5_3/XT2OUT: C5.2 MSP430F5438A.90 P4.15 XT2.1 | length 887.6
  Top Layer w10: C5.2 -2155.53,1034 -2082.53,1107 XT2.1 -2044,1145 -1909,1145 -1859,1095 P4.15 -1779,1095 -1718.37,1155.63 MSP430F5438A.90
P5_4: MSP430F5438A.51 P3.1 | length 598.3
  Top Layer w10: MSP430F5438A.51 -892.78,1561.22 -809,1645 -729,1645 -529,1845 P3.1
P5_5: MSP430F5438A.52 P3.2 | length 703.6
  Top Layer w10: MSP430F5438A.52 -912.46,1586.54 -824,1675 -749,1675 -579,1845 -579,1945 P3.2
P5_6: MSP430F5438A.53 P3.3 | length 567.4
  Top Layer w10: MSP430F5438A.53 -932.15,1611.85 -839,1705 -769,1705 -629,1845 P3.3
P5_7: MSP430F5438A.54 P3.4 | length 672.6
  Top Layer w10: MSP430F5438A.54 -951.83,1637.17 -854,1735 -789,1735 -679,1845 -679,1945 P3.4
P6_0: MSP430F5438A.97 P4.22 | length 669.7
  Top Layer w10: P4.22 -1879,745 -1779,745 -1664,860 -1664,920 -1566.17,1017.83 MSP430F5438A.97
P6_1: MSP430F5438A.98 P4.23 | length 570.3
  Top Layer w10: P4.23 -1779,695 -1634,840 -1634,915 -1550.85,998.15 MSP430F5438A.98
P6_2: MSP430F5438A.99 P4.24 | length 712.3
  Top Layer w10: P4.24 -1879,645 -1774,645 -1604,815 -1604,905 -1530.54,978.46 MSP430F5438A.99
P6_3: MSP430F5438A.100 P4.25 | length 610
  Top Layer w10: P4.25 -1774,595 -1574,795 -1574,895 -1510.22,958.78 MSP430F5438A.100
P6_4: MSP430F5438A.1 P1.1 | length 607.1
  Top Layer w10: P1.1 -1729,545 -1524,750 -1429,750 -1365.22,813.78 MSP430F5438A.1
P6_5: MSP430F5438A.2 P1.2 | length 706.5
  Top Layer w10: P1.2 -1679,445 -1679,540 -1499,720 -1419,720 -1345.54,793.46 MSP430F5438A.2
P6_6: MSP430F5438A.3 P1.3 | length 567.4
  Top Layer w10: P1.3 -1629,540 -1479,690 -1409,690 -1325.85,773.15 MSP430F5438A.3
P6_7: MSP430F5438A.4 P1.4 | length 669.7
  Top Layer w10: P1.4 -1579,445 -1579,540 -1459,660 -1399,660 -1306.17,752.83 MSP430F5438A.4
P7_0/XIN: C4.2 MSP430F5438A.13 P1.13 XT1.1 | length 888.8
  Top Layer w10: MSP430F5438A.13 P1.13 -1129,485 -1179,435 -1179,231 -1144.63,196.63 -1118.09,196.63 -1100,178.54 C4.2
  Bottom Layer w10: P1.13@-1129,485 P1.13
P7_1/XOUT: C2.2 MSP430F5438A.14 P1.14 XT1.2 | length 936.1
  Top Layer w10: MSP430F5438A.14 -1109.32,565.32 -1079,535 -1079,474 -1122.01,430.99 -1122.01,401.99 P1.14 -1129,270.54 -1125.96,267.5 -1055.5,267.5 -1004,216 C2.2
P7_2: MSP430F5438A.55 P3.5 | length 533.5
  Top Layer w10: MSP430F5438A.55 -971.52,1657.48 -864,1765 -809,1765 -729,1845 P3.5
P7_3: MSP430F5438A.56 P3.6 | length 638.7
  Top Layer w10: MSP430F5438A.56 -991.2,1682.8 -879,1795 -829,1795 -779,1845 -779,1945 P3.6
P7_4: MSP430F5438A.5 P1.5 | length 536.4
  Top Layer w10: P1.5 -1529,545 -1444,630 -1384,630 -1286.48,727.52 MSP430F5438A.5
P7_5: MSP430F5438A.6 P1.6 | length 638.7
  Top Layer w10: P1.6 -1479,445 -1479,545 -1424,600 -1374,600 -1266.8,707.2 MSP430F5438A.6
P7_6: MSP430F5438A.7 P1.7 | length 499.6
  Top Layer w10: P1.7 -1429,545 -1404,570 -1364,570 -1247.11,686.89 MSP430F5438A.7
P7_7: MSP430F5438A.8 P1.8 | length 596
  Top Layer w10: P1.8 -1384,440 -1384,530 -1369,545 -1349,545 -1227.43,666.57 MSP430F5438A.8
P8_0: MSP430F5438A.57 P3.7 | length 499.6
  Top Layer w10: MSP430F5438A.57 -1010.89,1703.11 -894,1820 -854,1820 -829,1845 P3.7
P8_1: MSP430F5438A.58 P3.8 | length 593.1
  Top Layer w10: MSP430F5438A.58 -1030.57,1723.43 -909,1845 -894,1845 -879,1860 -879,1945 P3.8
P8_2: MSP430F5438A.59 P3.9 | length 451
  Top Layer w10: MSP430F5438A.59 -1050.26,1748.74 -929,1870 P3.9
P8_3: MSP430F5438A.60 P3.10 | length 559.2
  Top Layer w10: MSP430F5438A.60 -1069.94,1774.06 -979,1865 -979,1945 P3.10
P8_4: MSP430F5438A.61 P3.11 | length 425.9
  Top Layer w10: MSP430F5438A.61 -1089.63,1799.37 -1029,1860 P3.11
P8_5: MSP430F5438A.65 P3.15 | length 425.9
  Top Layer w10: P3.15 -1229,1855 -1168.37,1794.37 MSP430F5438A.65
P8_6: MSP430F5438A.66 P3.16 | length 559.2
  Top Layer w10: P3.16 -1279,1945 -1279,1860 -1188.06,1769.06 MSP430F5438A.66
P8_7: MSP430F5438A.67 P3.17 | length 451
  Top Layer w10: P3.17 -1329,1870 -1207.74,1748.74 MSP430F5438A.67
P9_0: MSP430F5438A.68 P3.18 | length 593.1
  Top Layer w10: P3.18 -1379,1945 -1379,1860 -1364,1845 -1349,1845 -1227.43,1723.43 MSP430F5438A.68
P9_1: MSP430F5438A.69 P3.19 | length 502.5
  Top Layer w10: P3.19 -1429,1845 -1404,1820 -1359,1820 -1247.11,1708.11 MSP430F5438A.69
P9_2: MSP430F5438A.70 P3.20 | length 641.6
  Top Layer w10: P3.20 -1479,1945 -1479,1845 -1429,1795 -1374,1795 -1266.8,1687.8 MSP430F5438A.70
P9_3: MSP430F5438A.71 P3.21 | length 536.4
  Top Layer w10: P3.21 -1529,1845 -1451,1767 -1391,1767 -1286.48,1662.48 MSP430F5438A.71
P9_4: MSP430F5438A.72 P3.22 | length 676.7
  Top Layer w10: P3.22 -1579,1945 -1579,1845 -1472,1738 -1400,1738 -1306.17,1644.17 MSP430F5438A.72
P9_5: MSP430F5438A.73 P3.23 | length 567.4
  Top Layer w10: P3.23 -1629,1845 -1494,1710 -1424,1710 -1325.85,1611.85 MSP430F5438A.73
P9_6: MSP430F5438A.74 P3.24 | length 703.6
  Top Layer w10: P3.24 -1679,1945 -1679,1845 -1514,1680 -1439,1680 -1345.54,1586.54 MSP430F5438A.74
P9_7: MSP430F5438A.75 P3.25 | length 601.3
  Top Layer w10: P3.25 -1729,1845 -1539,1655 -1454,1655 -1365.22,1566.22 MSP430F5438A.75
P10_0: MSP430F5438A.76 P4.1 | length 604.2
  Top Layer w10: P4.1 -1779,1795 -1589,1605 -1589,1515 -1505.22,1431.22 MSP430F5438A.76
P10_1: MSP430F5438A.77 P4.2 | length 706.5
  Top Layer w10: P4.2 -1874,1740 -1779,1740 -1619,1580 -1619,1500 -1530.54,1411.54 MSP430F5438A.77
P10_2: MSP430F5438A.78 P4.3 | length 570.3
  Top Layer w10: P4.3 -1779,1695 -1644,1560 -1644,1485 -1550.85,1391.85 MSP430F5438A.78
P10_3: MSP430F5438A.79 P4.4 | length 672.6
  Top Layer w10: P4.4 -1879,1645 -1779,1645 -1669,1535 -1669,1470 -1571.17,1372.17 MSP430F5438A.79
P10_4: MSP430F5438A.80 P4.5 | length 536.4
  Top Layer w10: P4.5 -1774,1595 -1694,1515 -1694,1455 -1591.48,1352.48 MSP430F5438A.80
P10_5: MSP430F5438A.81 P4.6 | length 635.8
  Top Layer w10: P4.6 -1879,1545 -1779,1545 -1724,1490 -1724,1445 -1611.8,1332.8 MSP430F5438A.81
P10_6: MSP430F5438A.82 P4.7 | length 496.6
  Top Layer w10: P4.7 -1779,1495 -1754,1470 -1754,1435 -1632.11,1313.11 MSP430F5438A.82
P10_7: MSP430F5438A.83 P4.8 | length 584.3
  Top Layer w10: P4.8 -1879,1445 -1804,1445 -1652.43,1293.43 MSP430F5438A.83
P11_0: MSP430F5438A.84 P4.9 | length 451
  Top Layer w10: P4.9 -1794,1395 -1672.74,1273.74 MSP430F5438A.84
P11_1: MSP430F5438A.85 P4.10 | length 559.2
  Top Layer w10: P4.10 -1879,1345 -1789,1345 -1698.06,1254.06 MSP430F5438A.85
P11_2: MSP430F5438A.86 P4.11 | length 425.6
  Top Layer w10: P4.11 -1779,1295 -1719,1235 MSP430F5438A.86@-1428.21,1235
R\S\T\: C6.1 JTAG.11 MSP430F5438A.96 P4.21 R1.1 RST1.2 | length 2217.9
  Top Layer w10: JTAG.11@-2501,763 JTAG.11@-2493,763 ; v4(-2299,470) -2272.18,443.18 RST1.2@-2119.58,443.18 ; C6.1 -2047,848 v4(-1990,848) ; P4.21@-1854,795 P4.21 -1774,795 -1694,875 -1694,930 -1586.48,1037.52 MSP430F5438A.96
  Bottom Layer w10: JTAG.11 -2447,710 -2334,710 -2299,675 v4(-2299,470) ; RST1.2@-2118.8,191.61 -2119.58,192.39 -2119.58,443.18 -2080.82,443.18 -2042,482 -2042,664 ; R1.1 -2046,660 -2042,664 ; P4.21 -1836.99,802.99 -1863.99,802.99 -1909,848 v4(-1990,848) -2020,818 -2020,686 -2042,664
TCK: JTAG.7 MSP430F5438A.95 P4.20 | length 1247.1
  Top Layer w10: JTAG.7 -2449,912 -2361,912 -2339,890 -2274,890 -2254,910 -1944,910 P4.20 -1909,895 -1859,845 -1779,845 -1724,900 -1724,940 -1606.8,1057.2 MSP430F5438A.95
TDI: JTAG.3 MSP430F5438A.93 P4.18 | length 1304.3
  Top Layer w10: JTAG.3@-2498,1161 -2449,1112 -2370.17,1112 -2340.84,1082.66 -2340.84,1010.84 -2285,955 -2014,955 -1974,995 P4.18 -1909,995 -1859,945 -1799,945 -1647.43,1096.57 MSP430F5438A.93
  Bottom Layer w10: JTAG.3@-2499,1155 JTAG.3
TDO: JTAG.1 MSP430F5438A.92 P4.17 | length 1538.6
  Top Layer w10: JTAG.1 -2499,1330 -2439,1390 v4(-2185,1390) ; P4.17 -1794,995 -1672.74,1116.26 MSP430F5438A.92
  Bottom Layer w10: v4(-2185,1390) -2160,1365 -2160,1090 -2114,1044 -1901,1044 -1861.39,1004.39 -1838.39,1004.39 P4.17
TEST: JTAG.8 MSP430F5438A.91 P4.16 | length 1084.1
  Top Layer w10: v4(-2268,980) -2112,980 -2029,1063 -1997,1095 P4.16 -1914,1095 -1864,1045 -1784,1045 -1693.37,1135.63 MSP430F5438A.91@-1428.21,1135.63
  Bottom Layer w10: JTAG.8 -2385,962 -2367,980 v4(-2268,980)
TMS: JTAG.5 MSP430F5438A.94 P4.19 | length 1235.3
  Top Layer w10: JTAG.5 -2449,1012 -2377,1012 -2295,930 -1999,930 -1984,945 -1904,945 P4.19@-1854,895 ; P4.19@-1844,895 P4.19 -1779,895 -1754,920 -1754,950 -1627.11,1076.89 MSP430F5438A.94
VCC5V: D2.1 EXT.1 P4.26 | length 1946.1
  Top Layer w15: v2(-2559,575) -2519,535 v2(-2439,535)
  Top Layer w20: v2(-2439,535) -2383,591 -1933,591 P4.26
  Bottom Layer w15: v2(-2559,575) -2557.3,576.7 -2557.3,1564.87 D2.1@-2504.17,1618
  Bottom Layer w20: EXT.1 v2(-2439,535)
VCORE: C10.1 MSP430F5438A.62 P3.12 | length 702.2
  Top Layer w10: MSP430F5438A.62 -1109.32,1819.68 -1079,1850 -1079,1925 -1029,1975 P3.12 -944,2080 -944,2118 C10.1
pads on no net: JTAG.4 JTAG.6 JTAG.10 JTAG.12 JTAG.13 JTAG.14

## Polygon pours and split planes (outlines as drawn)
AVSS on Bottom Layer "Top Layer-No Net" (hatched Horizontal grid 20 track 20, remove dead copper, pour order 5): -2024.61,-877.95 508.98,-374.69 341.41,2375.44 -1153.54,2654.53 -2878.94,2430.12 -3470.47,707.68
AVSS on Top Layer "Top Layer-No Net" (hatched Horizontal grid 20 track 20, remove dead copper, pour order 2): -3575,-500 1290.65,-566.77 1196.29,2660.59 -3575,2660.59

## Keep-outs
Keep-Out Layer:
  the board outline again, w3.94

## Silkscreen, mask and mechanical layers (free items; w line width, h text height)
Top Overlay:
  rectangle: -1190,345 -1189,351
  lines w3.94: -183,2169 -183,2170
  lines w10: -570.3,348.3 -513,291 -394,291 ; -567,345 -579,357 -579,445 -502,445 -393,336 -393,292 ; -378,1864 -184,1864 -184,1743 -377,1743 -377,1863 ; -2056,535 -2056,641 -1878,641 -1878,535 -2056,535 ; -1798,1945 -1679,1945 -1679,2123 -1798,2123 -1798,1945
  text "GND" at -2409,2148 h60
  text "P3" at -507,2129 h100 r180
  text "3V3" at -2128,2112 h60
  text "GND" at -1690,2103 h50 r180
  text "51   53    55    57    59     61   63    65    67    69    71    73   75" at -513,1835 h50 r180
  text "76    78    80    82    84    86    88    90    92    94    96    98   100" at -1759.87,1814.13 h50 r270
  text "3V3" at -220,1764 h50 r90
  text "P4" at -2053,778 h100 r270
  text "5V" at -2031,613 h50 r270
  text "26    28    30    32    34    36    38    40    42    44   46    48   50" at -489,582 h50 r90
  text "P2" at -197,581 h100 r90
  text "1     3      5      7      9     11    13     15    17    19    21   23   25" at -1735,557 h50
  text "+5V" at -2360,409 h40 r270
  text "GND" at -509,303 h50
  text "P1" at -1722,267 h100
  text "GND" at -2360,263 h40 r270
Bottom Overlay:
  text "MSP430_Mini_Board_2021.6.12" at -1025,600 h50
Mechanical 1:
  lines w10: -2619,199.97 ccw(c-2414,200) -2414,-5 ; -2619,199.97 cw(c-2414,200) -2619,200 ; -2619,199.97 cw(c-2614,200) -2619,200 ; -2619,200 -2619,2030 ; -2619,2030 cw(c-2414,2030) -2414.03,2235 ; -2619,2030 -2619,2030 ; -2414.03,2235 cw(c-2414,2230) -2414,2235 ; -2414.03,2235 cw(c-2414,2230) -2414,2235 ; -2414.03,2235 cw(c-2414,2030) -2414,2235 ; -2414,-5 -205.87,-5 ; -2414,-5 -2414,-5 ; -2414,2235 -205.87,2235 ; -205.84,-5 ccw(c-205.87,200) -0.87,200 -0.87,2030 ccw(c-205.87,2030) -205.87,2235 ; -205.87,-5 ccw(c-205.87,200) -205.84,-5 ; -205.87,-5 ccw(c-205.87,0) -205.84,-5 ; -205.87,-5 ccw(c-205.87,0) -205.84,-5 ; -205.87,2235 -205.87,2235
Mechanical 15:
  lines w3.94: -488,187 -313,187 ; -311,185 -184,58 ; -212,58 -184,58 ; -184,85 -184,58
  text "5.08mm" at -483,206 h40

## Text inside footprints (layer, text, board x,y; h text height)
D3: Top Overlay "+" at -1880,2132 h40 r270